# Altium PCB DT10966_MOTOR_CONTROLLER.PcbDoc (part 7 of 8)
Units mm, origin at the board's own origin, x right, y up, seen from the top; angles counter-clockwise.
Board outline 300 x 19 mm, 10 copper layers (Top Layer, Layer 2 GND, Layer 3 SIG, Layer 4 GND, Layer 5 PWR, Layer 6 PWR, Layer 7 GND, Layer 8 SIG, Layer 9 GND, Bottom Layer), stack 2.418 mm thick; 745 components, 446 nets, 2132 pads, 1222 vias.
Unrouted connection lines stored in the file: 3.
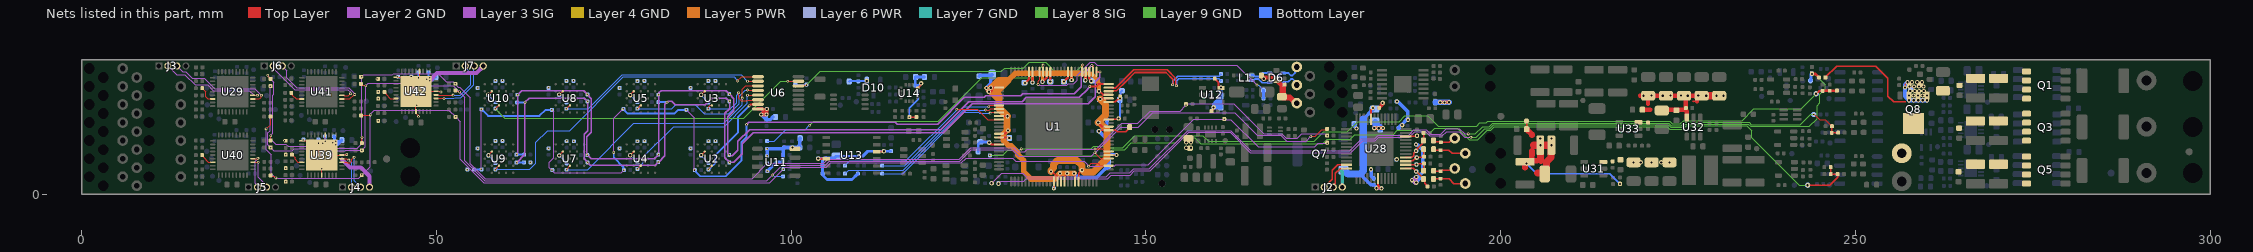
[diagram p14: the nets of this part, all layers, seen from the top]

## Via types
v1: diameter 0.6, hole 0.3, Top Layer to Bottom Layer, tented both sides, 726 vias
v2: diameter 0.4, hole 0.2, Top Layer to Bottom Layer, tented both sides, 493 vias
v3: diameter 0.5, hole 0.2, Top Layer to Bottom Layer, tented both sides, 3 vias

## Nets (pads, with @x,y where several pads share a name; then routed paths per layer and width w, separated by ;. In a path a pad name is that pad's centre, name@x,y a point inside that pad or via, vN(x,y) a via of type N, cw(c..) or ccw(c..) an arc to the next point about the centre after c; other vN are vias at no path point) (continued)
PSGND4: C202.1 C203.1 C204.1 C206.1 C207.1 C208.1 C209.1 C210.1 C211.1 J4.4 R229.1 U39.4 U39.10 U39.23 U39.32 U39.37 | length 26.1
  Top Layer w0.15: U39.10@31.037,7.537 U39.10@31.212,7.537 ; v2(31.232,7.667) 31.212,7.648 U39.10@31.212,7.537 ; U39.23@33.862,2.712 U39.37@33.862,5.537 ; U39.4@34.362,8.362 v2(34.362,7.483) 34.362,6.037 U39.37@33.862,5.537 ; v2(37.368,5.637) 37.3,5.637 37.217,5.555 36.704,5.555 U39.32@36.687,5.537 U39.37@33.862,5.537 ; U39.10@31.212,7.537 31.862,7.537 U39.37@33.862,5.537
  Layer 2 GND w0.6: 36.687,4.917 37.834,3.77 39.36,3.77 40.586,2.544 J4.4@40.586,1.015
  Bottom Layer w0.15: C202.1@34.338,8.208 C202.1@34.35,8.196 ; v2@34.35,7.496 v2(34.362,7.483)
  Bottom Layer w0.3: C207.1@33.369,7.746 33.38,7.736 33.38,7.185 v2(33.39,7.175) ; v2@34.35,7.496 C202.1@34.35,8.196
  Bottom Layer w0.4: v2(33.982,7.185) 34.025,7.142 34.025,6.55 C208.1@34.085,6.49 ; v2(35.395,7.263) 35.674,6.985 36.066,6.985 36.119,7.037 ; v2@35.467,7.264 v2@35.686,7.483 ; C210.1@35.573,8.198 35.593,8.198 35.653,8.138 35.653,7.638 v2(35.808,7.483) ; R229.1@36.676,7.65 R229.1@36.676,7.643 ; v2(35.808,7.483) 35.808,7.26 35.896,7.26 35.991,7.165 36.119,7.037 ; v2(35.808,7.483) 36.516,7.483 R229.1@36.676,7.643 ; 36.119,7.037 36.676,7.595 R229.1@36.676,7.643
  other v2: 28.773,1.781 33.855,3.592 28.773,3.69 28.773,5.592 35.81,6.985 28.602,7.572
PSGND5: C232.1 C233.1 C234.1 C236.1 C237.1 C238.1 C239.1 C240.1 C241.1 J7.4 R264.1 U42.4 U42.10 U42.23 U42.32 U42.37 | length 28.5
  Top Layer w0.15: U42.10@44.305,16.515 U42.10@44.508,16.515 ; v2(44.508,16.551) U42.10@44.508,16.515 ; U42.37@47.13,12.515 47.13,11.435 47.435,11.131 47.435,11.005 v2(47.482,10.957) ; v2(47.488,16.445) 47.488,14.872 U42.37@47.13,14.515 ; U42.4@47.63,17.34 47.63,16.64 47.499,16.509 47.424,16.509 47.13,16.215 U42.37@47.13,14.515 ; v2(50.63,14.43) 50.563,14.43 50.495,14.498 49.973,14.498 U42.32@49.955,14.515 U42.37@47.13,14.515 ; U42.10@44.508,16.515 45.13,16.515 U42.37@47.13,14.515
  Top Layer w0.4: U42.37@47.13,12.515 47.184,12.569 v2(47.23,12.569)
  Layer 2 GND w0.6: v2(49.089,16.005) 49.27,16.186 49.27,16.267 50.09,17.087 55.64,17.087 56.605,18.052 J7.4@56.605,18.1
  Bottom Layer w0.3: v2(47.488,16.445) C232.1@47.488,17.228 ; v2(48.663,16.213) 48.682,16.193 48.763,16.193 48.932,16.024 49.07,16.024 v2(49.089,16.005) ; v2@48.743,16.227 48.958,16.442 49.057,16.442 v2(49.076,16.461) ; C240.1@48.87,17.226 48.87,16.683 49.076,16.476 v2(49.076,16.461) ; 49.076,16.249 49.076,16.037 49.09,16.024 49.434,16.024 49.467,16.057 ; 49.076,16.249 v2(49.076,16.461) ; 49.076,16.249 49.114,16.287 49.465,16.287 ; v2(49.076,16.461) 49.104,16.461 49.158,16.515 49.465,16.515 ; 49.465,16.287 49.465,16.515 ; 49.465,16.287 49.465,16.058 49.467,16.057 ; 49.465,16.515 R264.1@49.925,16.515 49.925,16.476 49.718,16.269 49.679,16.269 49.467,16.057
  other v2: 41.803,10.367 41.803,13.488 41.803,14.433 47.332,15.173 41.636,16.27 46.466,16.605
REFCAP1: C149.2 U29.16 | length 2.5
  Top Layer w0.15: C149.2@17,14.958 17,14.938 17.496,14.442 17.496,13.735 17.782,13.449 U29.16@18.47,13.449
REFCAP2: C221.2 U40.16 | length 2
  Top Layer w0.15: C221.2@16.998,5.533 17.149,5.382 17.149,5.274 17.886,4.537 U40.16@18.496,4.537
REFCAP3: C231.2 U41.16 | length 1.9
  Top Layer w0.15: C231.2@29.562,14.299 29.713,14.148 29.713,13.992 30.256,13.449 U41.16@31.037,13.449
REFCAP4: C211.2 U39.16 | length 1.9
  Top Layer w0.15: C211.2@29.653,5.592 30.116,5.13 30.116,4.925 30.486,4.555 31.02,4.555 U39.16@31.037,4.537
REFCAP5: C241.2 U42.16 | length 2.1
  Top Layer w0.15: C241.2@42.683,14.433 42.834,14.282 42.834,14.151 43.487,13.498 44.288,13.498 U42.16@44.305,13.515
RSGND: C116.1 C121.1 C124.1 C126.1 C129.1 C130.1 C131.1 C132.1 C133.1 C134.2 C135.1 C136.1 C137.1 J2.4 R175.1 U28.10 | length 39.2
  Top Layer w0.2: U28.10@186.602,8.17 188.11,8.17 v1(188.198,8.257)
  Top Layer w0.5: v1(182.165,9.327) 182.173,9.319 182.783,9.319 182.789,9.324 183.384,9.324 v1(183.396,9.337) ; C136.1@182.851,12.198 182.851,12.218 183.327,12.694 183.327,12.878 v1(183.346,12.897) ; C136.1@182.874,12.193 C136.1@182.874,12.213
  Layer 2 GND w0.5: v1(182.165,9.327) 182.173,9.319 182.783,9.319 182.789,9.324 183.384,9.324 v1(183.396,9.337) ; v1(187.493,2.005) 187.512,2.024 187.648,2.024 188.056,2.433 v1(188.083,2.433) v1(188.083,1.65) 188.064,1.669 187.856,1.669 187.52,2.005 v1(187.493,2.005)
  Layer 9 GND w0.5: v1(182.165,9.327) 182.173,9.319 182.783,9.319 182.789,9.324 183.384,9.324 v1(183.396,9.337)
  Layer 5 PWR w0.5: v1(182.165,9.327) 182.173,9.319 182.783,9.319 182.789,9.324 183.384,9.324 v1(183.396,9.337)
  Layer 6 PWR w0.5: v1(182.165,9.327) 182.173,9.319 182.783,9.319 182.789,9.324 183.384,9.324 v1(183.396,9.337)
  Layer 4 GND w0.5: v1(182.165,9.327) 182.173,9.319 182.783,9.319 182.789,9.324 183.384,9.324 v1(183.396,9.337)
  Layer 7 GND w0.5: 177.456,3.367 177.66,3.163 J2.4@177.66,1.015
  Layer 3 SIG w0.5: v1(182.165,9.327) 182.173,9.319 182.783,9.319 182.789,9.324 183.384,9.324 v1(183.396,9.337)
  Layer 8 SIG w0.5: v1(182.165,9.327) 182.173,9.319 182.783,9.319 182.789,9.324 183.384,9.324 v1(183.396,9.337)
  Bottom Layer w0.5: C137.1@179.349,9.89 179.484,9.755 179.484,9.484 179.652,9.316 v1(179.652,9.289) v1@179.679,9.289 ; v1(181.722,3.527) 181.741,3.508 181.741,2.566 182.072,2.235 C135.1@182.092,2.235 ; v1(182.165,9.327) 182.184,9.346 182.184,10.317 C134.2@182.213,10.345 182.372,10.345 182.641,10.076 182.641,9.916 182.819,9.739 182.819,9.706 ; R175.1@182.764,9.327 182.329,9.327 182.708,9.706 182.819,9.706 ; v1(182.791,9.312) 182.81,9.292 182.81,9.226 182.952,9.084 R175.1@183.007,9.084 ; R175.1@182.819,9.273 182.819,9.706 ; v1(183.396,9.337) 183.369,9.337 183.227,9.194 183.117,9.194 R175.1@183.007,9.084 ; v1(185.354,13.082) 185.352,13.084 C121.1@185.304,13.084 185.304,13.064 185.314,13.054 185.516,13.054 186.911,11.659 v1(186.911,10.504) 186.713,10.504 186.113,9.904 186.113,9.777 v1(186.094,9.758) 186.075,9.739 185.916,9.739 185.581,9.405 C133.1@185.581,9.385 ; v1(187.493,2.005) v1@187.52,2.005 ; v1(188.044,7.036) 188.063,7.017 188.224,7.017 188.982,6.26 188.982,6.143 188.994,6.131 C129.1@188.996,3.239 C129.1@188.996,3.239 188.986,3.229 188.986,3.112 188.595,2.721 ; 182.819,9.706 182.968,9.706 183.298,9.376 R175.1@183.007,9.084 ; v1@187.52,2.005 187.928,2.414 188.064,2.414 v1(188.083,2.433) ; v1@187.52,2.005 187.856,1.669 188.064,1.669 v1(188.083,1.65) v1@188.083,1.677 ; v1@188.083,1.677 188.595,2.188 188.595,2.721 ; v1@188.083,1.677 v1(188.083,2.433) ; v1(188.083,2.433) 188.103,2.452 188.325,2.452 188.595,2.721
  other v1: 185.329,4.937
S1N: C130.2 R179.2 R181.1 U28.2 | length 3.7
  Top Layer w0.2: U28.2@186.602,4.17 186.628,4.196 188.082,4.196 v1(188.108,4.222) 188.174,4.288 189.092,4.288 R179.2@189.141,4.337 ; R181.1@189.125,3.326 189.141,3.342 R179.2@189.141,4.337 ; R179.2@189.158,4.354 R179.2@189.141,4.337
S1N_IN: C128.2 R181.2 X4.1 | length 3.2
  Top Layer w0.15: R181.2@190.535,3.326 R181.2@190.595,3.265
  Top Layer w0.2: R181.2@190.595,3.265 C128.2@191.509,3.265 191.65,3.407 193.254,3.407 X4.1@193.5,3.653
S1P: C129.2 R176.1 R177.2 U28.1 | length 4.5
  Top Layer w0.2: U28.1@186.602,3.67 187.625,3.67 v1(188.056,3.239) 188.077,3.239 189.117,2.199 R176.1@189.117,2.153 ; R176.1@189.117,2.165 189.246,2.036 189.246,1.6 R177.2@189.761,1.084
S1P_IN: C127.2 R176.2 X3.1 | length 4.8
  Top Layer w0.15: R176.2@190.527,2.165 R176.2@190.581,2.218
  Top Layer w0.2: R176.2@190.581,2.218 C127.2@191.509,2.218 192.705,2.218 193.395,1.528 X3.1@195,1.528
S2N: C132.2 R185.2 R186.1 U28.4 | length 5
  Top Layer w0.2: U28.4@186.602,5.17 186.652,5.22 187.48,5.22 187.715,5.455 187.715,5.796 188.128,6.209 188.128,6.317 188.193,6.382 188.193,6.44 188.545,6.792 188.545,6.798 188.912,7.165 188.912,7.38 189.142,7.61 189.142,8.636 R185.2@189.121,8.656
  other v1: 188.052,6.133
S2N_IN: C139.2 R186.2 X6.1 | length 3.2
  Top Layer w0.2: R186.2@190.543,7.435 191.445,7.435 C139.2@191.54,7.339 192.744,7.339 193.308,7.903 X6.1@193.5,7.903
S2P: C131.2 R183.1 R184.2 U28.3 | length 3.8
  Top Layer w0.2: U28.3@186.602,4.67 186.652,4.72 187.609,4.72 188.066,5.177 v1(188.163,5.177) ; v1@188.128,5.216 188.147,5.197 189.123,5.197 189.142,5.216 189.128,5.231 189.128,6.224 R183.1@189.114,6.238
S2P_IN: C138.2 R183.2 X5.1 | length 4.7
  Top Layer w0.2: R183.2@190.524,6.238 192.688,6.238 193.148,5.778 X5.1@195,5.778
SPI_A_EN: R99.1 U1.11 | length 25.7
  Top Layer w0.15: v2(123.327,11.993) 126.219,11.993 127.675,10.537 U1.11@129.286,10.537
  Bottom Layer w0.15: R99.1@107.584,4.037 108.258,4.712 116.146,4.712 123.227,11.792 123.227,11.824 123.327,11.925 v2(123.327,11.993)
SPI_A_MISO: R101.1 U1.8 | length 25.5
  Top Layer w0.15: v2(127.398,11.887) 127.946,11.887 128.096,12.037 U1.8@129.286,12.037
  Bottom Layer w0.15: R101.1@107.584,2.917 108.086,3.419 115.811,3.419 124.278,11.887 v2(127.398,11.887)
SPI_A_MOSI: R100.2 U1.7 | length 20
  Top Layer w0.15: v2(127.844,12.354) 127.901,12.354 128.085,12.537 U1.7@129.286,12.537
  Bottom Layer w0.15: R100.2@112.821,4.037 116.033,4.037 124.349,12.354 v2(127.844,12.354)
SPI_A_SCK: R102.2 U1.9 | length 20.1
  Top Layer w0.15: v2(128.04,11.459) 128.107,11.459 128.185,11.537 U1.9@129.286,11.537
  Bottom Layer w0.15: R102.2@112.819,2.908 115.691,2.908 124.326,11.543 126.412,11.543 126.496,11.459 v2(128.04,11.459)
SPI_B_CLK: R85.1 R94.1 R172.2 R191.2 R233.2 R248.2 R258.2 R268.2 U1.52 | length 185.2
  Top Layer w0.127: v2(26.004,9.219) 26.025,9.219 26.635,9.829 R191.2@26.635,10.949 ; R248.2@26.609,2.678 26.757,2.53 27.111,2.53 27.313,2.328 v2(27.387,2.328) ; R258.2@39.388,11.093 39.439,11.145 40.622,11.145 v2(40.674,11.197)
  Top Layer w0.15: v2(141.905,3.961) 142.311,4.367 143.358,4.367 143.446,4.279 143.446,4.141 143.55,4.037 U1.52@144.736,4.037
  Layer 3 SIG w0.127: v2(26.004,9.219) 26.017,9.206 26.017,6.289 26.705,5.601 26.705,2.95 26.901,2.755 27.327,2.328 v2(27.387,2.328) 27.432,2.283 30.958,2.283 30.968,2.293 39.079,2.293 39.514,2.729 40.649,3.864 ; 40.674,3.864 40.674,11.271 41.242,11.839 51.781,11.839 v2(52.708,10.912) 53.383,10.238 53.383,4.978 56.703,1.658 96.998,1.658 v2(98.884,3.545) 99.157,3.817 104.964,3.817 105.577,4.43 123.977,4.43 124.665,5.118
  Layer 3 SIG w0.15: 124.665,5.118 131.215,5.118 131.663,4.67 141.273,4.67 141.587,4.356 141.793,4.15 141.793,4.14 141.905,4.028 v2(141.905,3.961) ; v2@141.941,4.003 141.974,3.97 145.518,3.97 145.717,4.169 150.33,4.169 156.719,10.557 v2(161.012,10.557) ; v2@161.022,10.548 161.967,10.548 165.833,6.682 173.786,6.682 174.295,7.191 v2(175.528,7.191)
  other v2: 39.505,2.738
SPI_B_MISO: R87.1 R93.1 R173.2 R193.2 R235.2 R250.2 R260.2 R270.2 U1.56 | length 191.8
  Top Layer w0.127: v2(26.248,16.784) 26.248,16.71 26.336,16.622 26.336,16.607 26.635,16.307 R193.2@26.635,16.262 ; R250.2@26.635,7.616 26.648,7.63 26.648,8.242 v2(26.662,8.255) ; R235.2@39.508,7.21 39.517,7.218 39.517,8.014 v2(39.525,8.023)
  Top Layer w0.15: v2(142.817,6.396) 143.802,6.396 144.161,6.037 U1.56@144.736,6.037
  Layer 3 SIG w0.127: v2(26.248,16.784) 26.248,16.71 26.373,16.585 26.373,16.562 27.103,15.832 27.103,14.124 26.926,13.946 26.926,8.593 26.662,8.329 26.662,7.766 27.337,7.092 28.806,7.092 29.135,6.763 35.052,6.763 35.301,6.514 38.833,6.514 39.525,7.206 v2(39.525,8.023) 39.517,8.031 39.517,16.54 39.505,16.551 39.801,16.848 41.59,16.848 41.594,16.844 43.816,16.844 43.967,16.995 44.79,16.995 44.792,16.996 50.289,16.996 51.416,15.869 52.392,15.869 52.644,15.617 52.644,15.558 53.113,15.089 53.302,15.089 54.78,13.61 54.78,4.341 56.888,2.233 94.48,2.233 v2(96.607,4.36) 96.644,4.397 104.615,4.397 105.156,4.938 123.66,4.938 125.324,6.602 131.348,6.602 131.937,6.013 132.935,6.013 133.272,6.35 142.772,6.35 142.87,6.448 143.044,6.448 146.584,9.988 148.815,9.988 150.566,11.739 154.8,11.739 155.614,12.552 155.646,12.552 155.851,12.757 158.392,12.757 ; 158.392,12.758 162.383,12.758 166.574,8.567 169.118,8.567 169.755,7.93 171.328,7.93 171.952,8.555 175.2,8.555 v2(175.524,8.232)
  other v2: 155.64,12.552 52.673,15.588 39.508,16.555
SPI_B_MOSI: R86.1 R174.2 R194.2 R236.2 R251.2 R261.2 R271.2 U1.54 | length 190.5
  Top Layer w0.127: R271.2@52.681,14.698 52.851,14.528 53.1,14.528 53.187,14.44 v2(53.261,14.44) ; v2(173.242,8.165) 173.245,8.161 173.848,8.161 174.769,9.082 R174.2@175.528,9.082
  Top Layer w0.15: R261.2@39.371,15.571 39.537,15.404 39.868,15.404 39.974,15.298 v2(40.041,15.298) ; v2(142.801,5.869) 142.801,5.83 143.594,5.037 U1.54@144.736,5.037
  Layer 3 SIG w0.127: v2(26.575,15.251) 26.575,8.973 26.271,8.669 26.271,6.963 v2(26.657,6.577) 27.095,6.139 29.726,6.139 30.009,6.422 34.752,6.422 34.994,6.181 37.192,6.181 37.22,6.21 v2(39.508,6.21) 39.985,6.687 39.985,13.309 40.041,13.365 v2(40.041,15.298) 40.429,15.686 48.716,15.686 49.126,15.275 52.375,15.275 53.211,14.44 v2(53.261,14.44) 53.586,14.115 53.992,13.709 53.992,4.739 56.818,1.912 96.545,1.912 v2(97.359,2.727) 98.736,4.104 104.806,4.104 105.386,4.684 123.782,4.684 125.381,6.283 131.153,6.283 132.033,5.403 142.309,5.403 142.776,5.869 v2(142.801,5.869) 142.851,5.869 146.455,9.473 148.938,9.473 150.949,11.485 162.534,11.485 165.707,8.313 169.013,8.313 169.833,7.493 172.57,7.493 v2(173.242,8.165)
  Bottom Layer w0.15: v2(97.359,2.727) 97.426,2.727 97.627,2.526 98.86,2.526 R86.1@98.871,2.537
SPI_C_CLK: R18.1 R19.1 R32.1 R34.1 R35.1 R50.1 R51.1 R64.1 R65.1 U1.77 | length 135.6
  Top Layer w0.27: v2(142.373,18.161) 142.373,18.126 142.505,17.994 142.505,17.268 U1.77@142.511,17.262
  Layer 3 SIG w0.15: v2(56.321,3.529) 56.321,11.954 v2(56.354,11.986) ; v2(66.271,11.917) 66.532,11.657 66.532,5.141 65.937,4.545 65.937,3.775 66.642,3.069 76.073,3.069 v2(76.421,3.417) ; v2(75,5.921) 75,10.716 v2(76.321,12.037) ; v2(85.198,11.907) 85.24,11.907 86.371,10.775 v2(86.371,3.417)
  Layer 3 SIG w0.18: v2(93.701,9.837) 93.707,9.837 94.038,10.167 114.671,10.167 114.928,9.91 120.646,9.91 124.39,13.653 127.175,13.653 127.438,13.915 132.385,13.915 132.621,14.152 139.876,14.152 140.89,15.165 140.89,16.785 141.557,17.452 141.664,17.452 v2(142.373,18.161)
  Bottom Layer w0.27: R32.1@55.283,3.529 v2(56.321,3.529) R64.1@56.371,3.529 ; R65.1@56.233,11.865 v2(56.354,11.986) ; R65.1@56.325,12.015 v2(56.354,11.986) ; R65.1@56.354,11.983 v2(56.354,11.986) ; R65.1@56.361,11.986 56.361,11.975 56.493,11.843 56.505,11.843 57.293,11.055 64.517,11.055 65.38,11.917 v2(66.271,11.917) ; v2(75,5.921) 75,5.204 76.35,3.853 76.35,3.489 v2(76.421,3.417) ; R35.1@76.323,12.037 76.365,12.037 76.51,11.893 76.51,11.85 76.988,11.372 83.511,11.372 84.056,11.917 R19.1@85.229,11.917 85.218,11.907 v2(85.198,11.907) ; v2(86.371,3.417) 86.415,3.417 86.56,3.273 86.56,3.195 87.199,2.556 90.799,2.556 92.99,4.747 92.99,7.377 93.711,8.098 v2@93.711,9.827 ; R18.1@86.421,3.412 R18.1@86.421,3.417
  other v2: 66.294,3.417
SPI_C_EN: R49.2 TP2.1 U1.80 U6.6 | length 44.8
  Top Layer w0.15: U6.6@101.021,15.287 101.079,15.345 102.036,15.345 102.088,15.397 v2(102.155,15.397)
  Top Layer w0.153: U1.80@141.011,17.262 141.037,17.288 141.037,18.206 v2(141.063,18.232)
  Layer 8 SIG w0.15: v2(102.155,15.397) 104.076,17.318 129.584,17.318 130.061,17.794 132.701,17.794 133.533,18.626 135.838,18.626 137.027,17.437 140.267,17.437 v2(141.063,18.232)
  Bottom Layer w0.15: TP2.1@100.598,15.437 100.612,15.451 102.102,15.451 v2(102.155,15.397)
SPI_C_MISO: R22.1 R23.1 R33.1 R39.1 R40.1 R54.1 R55.1 R68.1 R69.1 U1.76 | length 129.3
  Top Layer w0.27: U1.76@143.011,17.262 143.029,17.244 143.497,17.244 v2(143.516,17.262)
  Layer 3 SIG w0.18: v2(61.321,4.474) 62.482,5.635 v2@62.482,12.938 ; v2@62.482,12.953 63.079,13.549 70.87,13.549 v2(71.321,13.097) 71.321,8.973 70.817,8.469 70.817,5.012 71.694,4.136 80.863,4.136 v2(81.287,4.559) 81.338,4.559 82.194,5.415 82.194,12.682 v2(82.5,12.987) 82.54,12.987 82.652,13.1 83.15,13.1 83.653,12.598 87.913,12.598 88.882,13.566 90.867,13.566 v2(91.321,13.112) 91.321,12.067 90.656,11.402 90.656,5.169 v2(91.327,4.498) 91.931,4.498 93.127,5.694 93.127,7.133 94.674,8.68 121.421,8.68 125.513,12.772 141.877,12.772 142.826,13.722 142.826,15.836 143.516,16.526 v2(143.516,17.262)
  Bottom Layer w0.27: R68.1@61.271,4.474 61.289,4.491 62.336,4.491 R33.1@62.354,4.508 ; R69.1@61.384,12.967 61.399,12.953 v2(62.488,12.953) ; R40.1@81.271,12.987 v2(82.5,12.987)
  other v2: 71.321,4.508
SPI_C_MOSI: R20.1 R21.1 R36.2 R37.1 R38.1 R52.1 R53.1 R66.1 R67.1 U1.75 | length 126.2
  Top Layer w0.27: v2(142.084,15.221) 143.003,15.221 143.319,15.537 U1.75@144.736,15.537
  Layer 3 SIG w0.18: v2(61.321,5.607) 61.321,5.667 61.457,5.802 v2(61.457,14.038) 62.019,14.6 65.781,14.6 65.784,14.603 70.756,14.603 v2(71.271,14.087) 71.852,13.506 71.852,8.768 71.217,8.133 71.217,5.695 71.243,5.669 71.243,5.566 71.806,5.003 77.535,5.003 77.537,5.004 80.728,5.004 v2(81.321,5.597) v2(81.321,14.037) 81.364,14.08 81.364,14.286 81.684,14.607 90.827,14.607 v2(91.321,14.112) 91.935,13.499 91.935,11.794 91.082,10.942 91.082,5.786 91.267,5.601 v2(91.267,5.564) 91.307,5.564 91.449,5.422 91.73,5.422 92.497,6.189 92.497,7.473 94.151,9.126 121.063,9.126 125.019,13.081 128.792,13.081 128.794,13.084 132.568,13.084 133.138,13.654 140.608,13.654 141.782,14.829 141.782,14.86 142.084,15.161 v2(142.084,15.221)
  Bottom Layer w0.27: v2(61.321,5.607) 61.331,5.597 62.337,5.597 62.341,5.6 R36.2@62.354,5.587 ; R67.1@61.407,14.038 R67.1@61.433,14.012 ; R67.1@61.446,14.025 R67.1@61.433,14.012 ; v2(61.457,14.038) 61.433,14.014 R67.1@61.433,14.012
  other v2: 71.271,5.538
SPI_EEPROM_CS: R84.1 U1.91 | length 44.3
  Top Layer w0.15: v2(135.508,18.219) 135.51,18.217 U1.91@135.511,17.262 U1.91@135.511,17.262
  Layer 8 SIG w0.15: v2(102.614,9.75) 103.175,10.311 120.709,10.311 126.865,16.467 133.757,16.467 v2(135.508,18.219)
  Bottom Layer w0.15: R84.1@96.606,7.512 97.582,7.512 99.2,9.13 101.948,9.13 102.568,9.75 v2(102.614,9.75)
SPI_FLASH1_CS: R10.1 U2.C2 U6.15 | length 13.4
  Top Layer w0.15: v2(88.341,3.518) 88.341,3.538 88.821,4.018 U2.C2@88.821,4.038
  Top Layer w0.27: v2(94.074,12.46) 94.074,12.484 94.277,12.687 U6.15@95.321,12.687
  Bottom Layer w0.27: v2(88.341,3.518) 88.38,3.518 88.58,3.718 88.622,3.718 89.324,4.419 89.324,5.509 92.5,8.686 92.5,10.886 v2(94.074,12.46)
SPI_FLASH2_CS: R14.1 U3.C2 U6.14 | length 10.4
  Top Layer w0.15: v2@88.333,12.06 v2(88.321,12.06) 88.364,12.103 88.364,12.318 88.576,12.531 88.815,12.531 U3.C2@88.821,12.537 ; v2(92.587,14.319) 92.587,13.512 92.938,13.161 93.741,13.161 93.879,13.298 95.282,13.298 U6.14@95.321,13.337
  Bottom Layer w0.15: v2(88.321,12.06) 91.421,12.06 92.306,12.945 92.306,13.999 92.587,14.28 v2(92.587,14.319)
SPI_FLASH3_CS: R24.1 U4.C2 U6.13 | length 23.2
  Top Layer w0.15: v2(78.321,3.587) 78.346,3.587 78.796,4.037 U4.C2@78.821,4.037 ; v2(93.84,13.97) 93.848,13.979 95.313,13.979 U6.13@95.321,13.987
  Bottom Layer w0.15: v2(78.321,3.587) 79.179,4.445 79.179,5.295 83.43,9.546 90.554,9.546 93.84,12.831 v2(93.84,13.97)
SPI_FLASH4_CS: R28.1 U5.C2 U6.12 | length 20.5
  Top Layer w0.15: v2(78.321,12.087) 78.346,12.087 78.796,12.537 U5.C2@78.821,12.537 ; v2(93.84,14.703) 93.872,14.67 95.289,14.67 U6.12@95.321,14.637
  Bottom Layer w0.15: v2(78.321,12.087) 83.162,12.087 83.7,12.625 86.482,12.625 87.77,11.337 91.222,11.337 92.674,12.789 92.674,13.817 93.511,14.655 93.792,14.655 v2(93.84,14.703)
SPI_FLASH5_CS: R41.1 U6.11 U7.C2 | length 33.9
  Top Layer w0.15: v2(68.371,3.471) 68.419,3.519 68.419,3.635 U7.C2@68.821,4.037 ; v2(93.105,13.563) 93.105,14.794 93.598,15.287 U6.11@95.321,15.287
  Bottom Layer w0.15: v2(68.371,3.471) 71.306,3.471 77.835,10 90.514,10 93.127,12.613 93.127,13.541 v2(93.105,13.563)
SPI_FLASH6_CS: R45.1 U6.10 U8.C2 | length 30
  Top Layer w0.15: v2(68.321,12.067) 68.336,12.067 68.806,12.537 U8.C2@68.821,12.537 ; v2(93.84,15.937) U6.10@95.321,15.937
  Bottom Layer w0.15: v2(68.321,12.067) 71.405,12.067 76.177,16.839 92.938,16.839 v2(93.84,15.937)
SPI_FLASH7_CS: R56.1 U6.9 U9.C2 | length 45.5
  Top Layer w0.15: v2(58.309,3.474) 58.309,3.499 58.821,4.012 U9.C2@58.821,4.037 ; v2(92.414,15.978) 93.024,16.587 U6.9@95.321,16.587
  Bottom Layer w0.15: R56.1@58.309,3.524 63.131,3.524 64,4.393 64,7.322 65.678,9 68.769,9 76.331,16.562 91.975,16.562 92.116,16.421 92.116,16.398 92.414,16.099 v2(92.414,15.978)
SPI_FLASH8_CS: R60.1 U6.7 U10.C2 | length 46.1
  Top Layer w0.15: v2(58.325,12.054) 58.332,12.054 58.815,12.537 U10.C2@58.821,12.537 ; v2(99.512,15.937) U6.7@101.021,15.937
  Layer 8 SIG w0.15: v2(58.325,12.054) 59.663,10.716 93.338,10.716 98.56,15.937 v2(99.512,15.937)
SWDCL_PGA: J2.3 U28.36 | length 3.9
  Top Layer w0.2: J2.3@176.39,1.015 176.39,1.234 176.688,1.533 176.688,2.96 177.35,3.622 178.214,3.622 U28.36@178.262,3.67
SWDCL_PGA1: J3.3 U29.30 | length 15.2
  Top Layer w0.15: U29.30@24.12,13.449 25.048,13.449 25.154,13.555 25.304,13.705 25.304,13.91 v2(25.352,13.958)
  Layer 3 SIG w0.15: J3.3@13.435,18.1 14.278,17.257 14.72,17.257 15.583,16.393 17.304,16.393 18.785,14.913 24.397,14.913 v2(25.352,13.958)
SWDCL_PGA2: J5.3 U40.30 | length 4.8
  Top Layer w0.15: U40.30@24.146,4.537 24.156,4.528 24.897,4.528 v2(24.907,4.518)
  Layer 3 SIG w0.15: v2(24.907,4.518) 24.879,4.491 24.879,2.392 26.073,1.199 J5.3@26.073,1.015
SWDCL_PGA3: J6.3 U41.30 | length 14.5
  Top Layer w0.15: U41.30@36.687,13.449 37.806,13.449 38.43,14.072 v2(38.489,14.072)
  Layer 3 SIG w0.15: J6.3@28.28,18.048 28.932,17.396 28.932,16.437 30.332,15.036 37.641,15.036 38.397,14.281 38.397,14.233 38.489,14.14 v2(38.489,14.072)
SWDCL_PGA4: J4.3 U39.30 | length 6.9
  Top Layer w0.15: U39.30@36.687,4.537 37.361,4.537 37.467,4.431 37.844,4.431 38.102,4.69 38.102,4.936 v2(38.409,5.242)
  Bottom Layer w0.15: v2(38.409,5.242) 38.406,5.239 38.406,1.945 39.316,1.035 J4.3@39.316,1.015
SWDCL_PGA5: J7.3 U42.30 | length 8.7
  Top Layer w0.15: U42.30@49.955,13.515 49.957,13.516 51.078,13.516 v2(51.08,13.518)
  Bottom Layer w0.15: v2(51.08,13.518) 52.482,13.518 52.568,13.604 53.429,13.604 55.286,15.46 55.286,17.999 J7.3@55.335,18.048
SWDIO_PGA: J2.2 U28.35 | length 5.2
  Top Layer w0.2: J2.2@175.12,1.015 176.237,2.132 176.237,3.42 176.987,4.17 U28.35@178.262,4.17
SWDIO_PGA1: J3.2 U29.31 | length 15
  Top Layer w0.15: U29.31@24.12,13.949 24.128,13.958 24.766,13.958 v2(24.775,13.966)
  Layer 3 SIG w0.15: J3.2@12.165,18.1 13.423,16.842 14.576,16.842 16.002,15.415 17.763,15.415 18.543,14.635 23.655,14.635 24.354,13.936 24.744,13.936 v2(24.775,13.966)
SWDIO_PGA2: J5.2 U40.31 | length 5.1
  Top Layer w0.15: U40.31@24.146,5.037 24.164,5.055 24.813,5.055 v2(24.852,5.094)
  Layer 3 SIG w0.15: J5.2@24.803,1.015 24.803,1.208 24.477,1.533 24.477,4.678 24.852,5.052 v2(24.852,5.094)
SWDIO_PGA3: J6.2 U41.31 | length 14.1
  Top Layer w0.15: U41.31@36.687,13.949 36.966,13.949 37.045,13.871 37.608,13.871 v2(37.907,14.169)
  Layer 3 SIG w0.15: J6.2@27.01,18.048 27.01,17.815 27.259,17.566 27.259,17.565 30.075,14.748 37.538,14.748 37.859,14.427 37.859,14.217 v2(37.907,14.169)
SWDIO_PGA4: J4.2 U39.31 | length 5.5
  Top Layer w0.15: U39.31@36.687,5.037 37.405,5.037 37.61,4.833 v2(37.677,4.833)
  Bottom Layer w0.15: v2(37.677,4.833) 38.046,4.465 38.046,1.028 J4.2@38.374,0.7
SWDIO_PGA5: J7.2 U42.31 | length 8.3
  Top Layer w0.15: U42.31@49.955,14.015 49.97,14 52.354,14 v2(52.368,13.985)
  Bottom Layer w0.15: v2(52.368,13.985) 53.374,13.985 54.852,15.463 54.852,17.128 54.253,17.727 J7.2@54.253,17.99
USB_CON_D_N: D6.3 D6.4 L1.1 X8.1 | length 7.8
  Bottom Layer w0.25: L1.1@164.85,16.04 165.1,16.04 165.312,16.251 165.769,16.251 165.777,16.244 165.852,16.244 166.359,15.736 167.368,15.736 D6.4@167.422,15.79 167.497,15.865 167.745,15.865 168.131,16.251 168.612,16.251 168.876,15.988 168.924,15.988 169.122,15.79 D6.3@169.322,15.79 169.397,15.865 170.051,15.865 170.447,16.261 170.654,16.261 171.253,15.662 X8.1@171.253,15.401
USB_CON_D_P: D6.1 D6.6 L1.4 X7.1 | length 8
  Bottom Layer w0.25: L1.4@164.85,16.84 165.1,16.84 165.312,16.628 165.952,16.628 166.414,17.09 D6.6@167.422,17.09 167.497,17.015 167.764,17.015 168.151,16.628 168.595,16.628 168.859,16.892 168.924,16.892 169.122,17.09 170.08,17.09 170.419,16.75 170.626,16.75 171.014,17.138 171.014,17.716 X7.1@171.253,17.955
USB_D_N: R203.2 U1.74 | length 19.3
  Top Layer w0.25: U1.74@144.736,15.037 145.325,15.037 145.386,14.975 145.693,14.975 146.892,16.175 148.267,17.55 152.979,17.55 154.203,16.327 154.203,15.641 154.204,15.639 154.204,15.421 154.279,15.346 v2(154.279,15.306)
  Bottom Layer w0.25: v2(154.279,15.306) 154.279,15.929 154.628,16.278 160.292,16.278 160.547,16.022 R203.2@160.549,16.022
USB_D_P: R202.2 U1.73 | length 19
  Top Layer w0.25: U1.73@144.736,14.537 145.325,14.537 145.386,14.599 145.849,14.599 147.269,16.019 148.424,17.173 152.823,17.173 153.826,16.171 153.826,15.632 153.781,15.587 153.781,15.481 v2(153.752,15.452)
  Bottom Layer w0.25: v2(153.752,15.452) 153.781,15.481 153.781,15.964 154.471,16.655 160.295,16.655 160.549,16.908 R202.2@160.55,16.908
USB_DET: R205.2 TP59.1 U1.92 | length 38.2
  Top Layer w0.127: v2(134.792,15.478) 134.792,15.915 134.919,16.042 134.919,16.077 135.011,16.169 U1.92@135.011,17.262
  Layer 3 SIG w0.127: v2(134.792,15.478) 134.866,15.478 134.985,15.359 138.839,15.359 139.069,15.59 139.81,15.59 140.332,16.111 140.332,16.808 142.146,18.622 142.692,18.622 143.096,18.217 162.816,18.217 v2(165.643,15.39)
  Bottom Layer w0.127: v2(165.643,15.39) 165.676,15.357 165.854,15.357 TP59.1@166.549,14.662
  Bottom Layer w0.4: R205.2@166.549,13.512 TP59.1@166.549,14.662
VA: C89.2 R130.1 R132.2 R216.1 TP8.1 | length 121.5
  Top Layer w0.3: v1(244.431,14.178) 244.489,14.178 244.874,14.563 245.32,14.563 245.364,14.606 246.352,14.606 247.347,14.606 R130.1@247.359,14.617
  Layer 8 SIG w0.127: v2@132.438,6.397 142.266,6.397 142.659,6.79 144.734,6.79 144.931,6.593 146.738,6.593 148.415,8.27 158.023,8.27 158.809,7.484 173.733,7.484 175.051,8.802 178.386,8.802 179.84,10.256 185.652,10.256 186.464,11.068 189.699,11.068 191.176,9.591 196.587,9.591 197.058,10.062 197.95,10.062 198.18,10.293 223.785,10.293 224.143,9.935 225.314,9.935 225.788,10.408 233.995,10.408 235.661,12.074 242.327,12.074 v1(244.431,14.178)
  Bottom Layer w0.127: R216.1@131.631,6.287 132.241,6.287 132.358,6.404 v2(132.431,6.404)
VB: C97.2 R140.1 R142.2 R241.1 TP13.1 | length 129.4
  Top Layer w0.127: v2(244.096,11.257) 244.169,11.257 244.28,11.147 244.284,11.147 244.909,10.521 245.748,10.521 R142.2@246.668,9.602 R142.2@246.645,9.579 ; C97.2@246.623,8.667 246.638,8.682 C97.2@246.645,8.689
  Top Layer w0.2: C97.2@246.638,8.682 247.525,8.682 R140.1@247.54,8.697 ; C97.2@246.645,8.689 R142.2@246.645,9.579
  Layer 3 SIG w0.127: v1(128.249,1.566) 129.667,2.985 132.616,2.985 133.132,2.469 140.076,2.469 140.078,2.47 144.409,2.47 144.953,3.015 147.696,3.015 148.262,3.58 150.477,3.58 155.87,8.974 161.971,8.974 164.782,6.162 178.731,6.162 180.424,7.855 182.23,7.855 182.712,8.338 187.002,8.338 187.74,9.076 189.523,9.076 190.119,8.48 191.562,8.48 191.607,8.524 ; 191.608,8.524 191.836,8.753 ; 191.836,8.754 192.327,9.245 194.163,9.245 194.893,8.515 v2(195.42,8.515)
  Layer 8 SIG w0.127: v2(195.42,8.515) 196.429,8.515 197.43,9.515 198.365,9.515 198.889,10.039 223.679,10.039 224.038,9.681 225.419,9.681 225.893,10.154 234.983,10.154 235.307,9.831 242.21,9.831 243.651,11.271 244.081,11.271 v2(244.096,11.257)
VBAT: C67.2 C68.2 C69.2 C74.2 C75.2 C76.2 C82.2 C83.2 C84.2 C157.2 C158.2 C161.2 C162.2 C167.2 C168.2 C177.2 C178.2 C179.2 C180.2 C246.2 C247.2 C248.2 C249.2 D7.1 Q1.5 Q1.6 Q1.7 Q1.8 Q3.5 Q3.6 Q3.7 Q3.8 Q5.5 Q5.6 Q5.7 Q5.8 Q8.1 Q8.2 Q8.3 R6.1 R7.1 R8.1 R131.2 TP40.1 U31.3 U32.3 U33.3 | length 44
  Top Layer w0.2: 227.074,13.079 227.095,13.1 227.651,13.1 ; R131.2@245.733,16.473 245.733,16.478 247.31,18.056 252.867,18.056 254.554,16.369 254.554,13.829 255.339,13.043 257.042,13.043 257.076,13.077 ; v1(256.962,15.054) 256.968,15.06 256.968,15.542 256.993,15.567
  Top Layer w0.6: 219.606,13.917 219.625,13.899 C179.2@220.757,13.899 ; C180.2@219.956,11.943 221.049,11.943 221.068,11.962 ; 220.754,12.723 220.754,13.895 C179.2@220.757,13.899 ; C177.2@222.693,11.815 222.797,11.919 224.595,11.919 224.605,11.91 C168.2@224.655,11.91 ; C168.2@224.74,11.825 C168.2@224.655,11.91 ; R7.1@226.076,12.164 226.076,13.628 C167.2@225.805,13.899 ; U32.3@226.215,10.837 226.215,11.722 226.072,11.865 R7.1@226.072,12.161 225.822,11.91 C168.2@224.655,11.91 ; 227.651,13.1 227.651,13.729 C249.2@227.82,13.899 ; v1(227.82,13.925) C249.2@227.82,13.899 ; C249.2@228.306,13.899 C249.2@227.82,13.899 ; C179.2@220.757,13.899 C178.2@223.272,13.899 C167.2@225.805,13.899 ; C167.2@225.805,13.899 v1(226.347,13.899) C249.2@227.82,13.899
  Top Layer w1: C249.2@228.306,13.899 v1(230.382,13.899) C248.2@230.771,13.899
  Bottom Layer w0.6: v1(257.291,15.791) 256.962,15.462 v1(256.962,15.054) 256.962,13.837 v1(257.536,13.263) v1(258.181,13.263) v1(258.826,13.263) v1(259.449,13.263) v1(260.071,13.263) v1(260.072,13.923)
  other v1: 218.715,4.511 219.72,4.511 221.25,4.511 222.609,4.511 223.759,4.511 220.094,13.895 222.825,13.895 228.955,13.899 231.394,13.899 221.214,13.91 223.932,13.925 225.402,13.925 257.533,13.923 258.154,13.923 258.803,13.923 259.444,13.923 257.704,14.567 258.327,14.567 258.954,14.567 259.59,14.567 257.568,15.199 258.238,15.199 258.908,15.199 259.578,15.199 257.955,15.791 258.689,15.791 259.344,15.791
VBUS: C152.2 C153.2 C154.2 D6.5 FB14.1 X9.1 | length 10.6
  Top Layer w0.6: FB14.1@166.29,16.749 166.35,16.689 166.35,16.634 166.588,16.396 v1(166.588,16.288) ; FB14.1@166.61,16.468 167.909,16.468 168.237,16.14 168.287,16.14 C153.2@168.372,16.055 ; C153.2@168.422,16.055 169.092,15.385 ; C152.2@169.523,15.445 C152.2@169.463,15.385 ; 169.092,15.385 169.092,13.829 C154.2@169.157,13.764 169.312,13.764 169.435,13.887 169.435,15.357 C152.2@169.463,15.385 ; 169.092,15.385 C152.2@169.463,15.385
  Top Layer w0.8: C154.2@169.333,13.743 169.425,13.651 170.274,13.651 171.064,12.861 X9.1@171.253,12.861
  Bottom Layer w0.2: v1(166.588,16.288) 166.664,16.364 167.346,16.364 D6.5@167.422,16.44
VC: C106.2 R150.1 R153.2 R275.1 TP18.1 | length 131.5
  Top Layer w0.2: v1(243.24,1.289) 246.341,1.289 247.447,2.396 247.447,2.838 R150.1@247.468,2.859 R153.2@246.497,2.859 246.486,2.869 246.486,3.831 C106.2@246.475,3.841
  Layer 8 SIG w0.127: v2(127.996,5.52) 129.825,5.52 130.533,6.228 131.762,6.228 132.555,5.435 139.796,5.435 139.804,5.443 144.395,5.443 145.259,6.307 146.99,6.307 147.948,7.265 154.161,7.265 154.9,8.003 156.837,8.003 157.717,7.123 174.908,7.123 175.562,7.777 178.787,7.777 179.44,8.43 184.858,8.43 185.43,9.001 188.56,9.001 188.994,8.568 189.93,8.568 190.69,9.328 190.696,9.328 191.02,9.328 193.869,9.328 195.531,7.666 196.722,7.666 198.063,9.007 198.576,9.007 199.1,9.531 223.469,9.531 223.827,9.173 225.63,9.173 226.103,9.646 234.668,9.646 235.34,8.975 235.34,7.972 242.023,1.289 v1(243.24,1.289)
VDC: C90.2 R131.1 R133.2 R277.1 TP9.1 | length 133.3
  Top Layer w0.4: v1(243.836,16.983) 243.861,16.958 244.353,16.958 244.833,16.478 R131.1@244.833,16.473
  Layer 3 SIG w0.127: v1(129.213,1.488) 129.578,1.853 132.743,1.853 133.099,2.208 144.589,2.208 145.11,2.729 147.77,2.729 148.334,3.293 150.576,3.293 156.002,8.72 161.866,8.72 164.706,5.879 178.82,5.879 180.525,7.584 182.318,7.584 182.808,8.075 187.11,8.075 187.854,8.818 189.422,8.818 190.014,8.226 191.777,8.226 192.395,8.843 194.158,8.843 194.945,8.056 v2(195.781,8.056)
  Layer 8 SIG w0.127: v2(195.781,8.056) 196.56,8.056 197.765,9.261 198.471,9.261 198.995,9.785 223.574,9.785 223.933,9.427 225.525,9.427 225.998,9.9 234.878,9.9 235.202,9.577 243.449,9.577 244.556,10.684 244.556,12.508 244.938,12.891 244.938,14.096 245.732,14.89 245.732,15.452 244.239,16.946 243.873,16.946 v1(243.836,16.983)
  Bottom Layer w0.4: TP9.1@243.641,16.009 243.708,16.076 243.708,16.935 243.756,16.983 v1(243.836,16.983)
VDD: C134.1 C135.2 C136.2 Q7.3 TP90.1 U28.20 U28.43 | length 20.9
  Top Layer w0.3: U28.20@181.682,10.59 181.682,11.881 181.864,12.063 181.884,12.063 181.99,12.169 v1(181.99,12.189) C136.2@181.994,12.193 ; U28.43@182.682,2.25 182.682,1.136 ; 182.682,1.136 182.818,1.136 v1@183.097,0.857 ; 182.682,1.136 182.491,0.946 v1(182.491,0.864) 182.498,0.857 v1@183.097,0.857 ; v1@183.097,0.857 183.104,0.85 v1(183.186,0.85) 183.179,0.857 v1@183.097,0.857
  Bottom Layer w0.5: 180.187,2.844 181.665,1.365 182.082,1.365 C135.2@182.092,1.355 182.112,1.355 182.472,0.995 182.472,0.883 v1(182.491,0.864) 182.498,0.857 183.179,0.857 v1(183.186,0.85) ; 180.618,10.595 181.99,11.967 v1(181.99,12.189)
  Bottom Layer w1: Q7.3@178.012,3.322 178.489,2.844 180.187,2.844 180.618,3.274 TP90.1@180.618,3.313 180.618,10.595
VDD_1V2: C17.2 C18.2 C19.2 C20.2 C21.2 C22.2 C23.2 C24.2 C25.2 C196.2 FB15.2 U1.16 U1.39 U1.45 U1.63 U1.71 U1.78 U1.84 U1.89 U1.95 | length 34.9
  Top Layer w0.2: v1@130.52,8.037 130.626,7.931 v1(130.735,7.931) ; v1(136.625,3.216) 136.701,3.14 136.892,3.14 137.492,2.54 137.492,1.832 U1.39@137.511,1.812 ; U1.45@140.511,1.812 140.511,2.963 v1(140.963,3.415) ; v1(143.266,10.115) 143.824,9.557 144.717,9.557 U1.63@144.736,9.537
  Top Layer w0.3: U1.16@129.286,8.037 v1@130.52,8.037 ; v1(132.97,15.7) 133.511,16.241 U1.95@133.511,17.262 ; v1(136.511,15.882) U1.89@136.511,17.262 ; v1(138.423,15.881) 139.011,16.469 U1.84@139.011,17.262 ; U1.78@142.011,17.262 142.011,16.308 142.285,16.035 v1(142.285,15.953) ; v1(143.547,13.433) 143.628,13.433 143.732,13.537 U1.71@144.736,13.537
  Layer 5 PWR w1: v1(136.625,3.216) 136.625,3.36 136.959,3.695 136.959,4.231 137.502,4.774 140.25,4.774 140.963,4.06 v1(140.963,3.415) 141.245,3.134 142.579,3.134 144.532,5.086 144.532,9.054 143.47,10.115 v1(143.266,10.115) 144.304,11.153 144.304,12.676 v1(143.547,13.433)
  other v1: 155.669,6.567 156.349,6.567 155.669,7.334 156.349,7.334
VDD_ACC: C58.2 C59.2 C60.2 C61.2 R95.2 R96.2 R97.2 R98.2 U13.4 U13.10 | length 20.8
  Top Layer w0.3: v1(103.81,5.034) 103.825,5.019 104.944,5.019 U13.4@104.959,5.003 ; U13.10@112.071,6.003 112.104,6.036 113.028,6.036 v1(113.061,6.069)
  Bottom Layer w0.3: v1(113.061,6.069) 113.076,6.084 114.077,6.084 R95.2@114.092,6.099
  Bottom Layer w0.4: v1(103.81,5.034) 103.872,5.096 104.441,5.096 ; R98.2@109.389,2.917 109.389,2.912 109.314,2.837 109.309,2.837 108.575,2.104 105.062,2.104 104.496,2.67 104.496,2.842 R97.2@104.421,2.917 R96.2@104.421,4.037 104.421,5.076 104.441,5.096 ; v1(113.061,6.069) 110.794,6.069 110.093,5.368 C58.2@106.347,5.368 106.136,5.157 104.881,5.157 C61.2@104.821,5.097 104.82,5.096 104.441,5.096
VDD_ACCEL: C62.2 C63.2 FB9.1 R105.2 R106.2 U14.11 | length 10.4
  Top Layer w0.2: v2(116.653,10.885) R105.2@117.653,10.885 ; U14.11@117.821,15.035 117.885,15.035 118.238,15.387 118.238,15.571 v1(118.314,15.647)
  Bottom Layer w0.2: v2(116.653,10.885) 116.653,12.149 117.932,13.428 117.932,14.531 117.593,14.869 117.593,15.22 C62.2@117.499,15.314
  Bottom Layer w0.4: C62.2@117.49,15.323 117.49,16.506 C63.2@117.521,16.537 FB9.1@118.774,16.537 ; C62.2@117.559,15.304 117.559,15.338 117.959,15.338 118.269,15.647 v1(118.314,15.647)
VDD_CLDR: C150.2 D10.1 FB13.2 | length 2.5
  Bottom Layer w0.3: FB13.2@108.18,15.911 108.242,15.973 110.593,15.973 D10.1@110.655,16.035
  other v1: 110.643,15.996
VDD_EEPROM: C52.2 C53.2 C54.2 FB6.2 R79.2 R80.2 R81.2 R82.2 R83.2 U11.8 | length 11.7
  Bottom Layer w0.5: v2(96.609,5.444) v2(96.609,5.444) 96.607,6.422 v2(96.606,6.423) 98.823,6.423 C52.2@98.884,6.484 ; v2(96.645,3.265) 96.645,3.27 97.89,4.515 98.859,4.515 98.884,4.54 R82.2@98.884,4.545 C52.2@98.884,6.484 ; FB6.2@101.204,6.604 C52.2@99.005,6.605 98.985,6.605 98.975,6.595 98.975,6.575 C52.2@98.884,6.484 ; FB6.2@101.204,6.604 101.226,6.626 101.226,7.875 C54.2@101.248,7.897
  other v1: 100.176,6.602
VDD_FLASH: C42.2 C43.2 C44.2 C45.2 C46.2 C47.2 C48.2 C49.2 C50.2 C51.2 FB5.2 R10.2 R11.2 R12.2 R13.2 R14.2 R15.2 R16.2 R17.2 R24.2 R25.2 R26.2 R27.2 R28.2 R29.2 R30.2 R31.2 R32.2 R33.2 R41.2 R42.2 R43.2 R44.2 R45.2 R46.2 R47.2 R48.2 R56.2 R57.2 R58.2 R59.2 R60.2 R61.2 R62.2 R63.2 U2.B4 U3.B4 U4.B4 U5.B4 U6.16 U7.B4 U8.B4 U9.B4 U10.B4 | length 28.1
  Top Layer w0.15: v1(57.321,14.037) U10.B4@57.821,14.537 ; v1(57.34,5.513) 57.34,5.534 57.821,6.016 U9.B4@57.821,6.037 ; v1(67.321,5.477) 67.321,5.507 67.821,6.007 U7.B4@67.821,6.037 ; v1(67.321,14.076) 67.341,14.076 67.802,14.537 U8.B4@67.821,14.537 ; v1(77.321,5.52) 77.321,5.528 77.821,6.029 U4.B4@77.821,6.037 ; v1(77.321,13.977) 77.321,14.007 77.821,14.507 U5.B4@77.821,14.537 ; v1(87.321,5.537) U2.B4@87.821,6.038 ; v1(87.321,14.037) U3.B4@87.821,14.537 ; U6.16@95.301,12.017 U6.16@95.321,12.037 ; v1@96.53,12.058 v1(96.551,12.037)
  Top Layer w0.25: U6.16@95.301,12.017 95.892,12.017 96.534,12.017 96.538,12.017 v1@96.551,12.017
  Top Layer w0.5: U6.16@95.321,12.037 95.871,12.037 95.892,12.017 96.191,11.718 96.191,11.67 ; 96.191,11.67 v1@96.534,12.012 ; 96.191,11.67 95.777,11.256 v1(95.777,11.248) v1(96.516,11.248) 96.534,11.265 v1@96.534,12.012 ; v1@96.534,12.012 96.538,12.017 96.551,12.03 v1(96.551,12.037) 96.534,12.02 96.534,12.017 v1@96.534,12.012
  Bottom Layer w0.15: v1(57.321,14.037) 57.321,13.995 58.329,12.987 R60.2@58.332,12.987 ; v1(57.34,5.513) 57.34,5.479 58.142,4.677 58.142,4.59 R56.2@58.309,4.424 ; v1(67.321,5.477) 67.341,5.477 68.205,4.614 68.205,4.537 R41.2@68.371,4.371 ; v1(67.321,14.076) 67.321,13.98 68.321,12.98 R45.2@68.321,12.967 ; v1(77.321,5.52) 77.321,5.498 78.321,4.497 R24.2@78.321,4.487 ; v1(77.321,13.977) 77.334,13.977 78.321,12.99 R28.2@78.321,12.987 ; C43.2@87.321,5.477 87.341,5.477 88.175,4.644 88.175,4.584 R10.2@88.341,4.418 ; C44.2@87.321,13.977 88.321,12.976 R14.2@88.321,12.96 ; C44.2@87.321,13.977 v1(87.321,14.037)
  Bottom Layer w0.5: v1(96.551,12.037) 96.551,12.017 C45.2@96.516,11.983 ; 97.423,10.901 97.038,10.516 96.519,10.516 C42.2@96.516,10.513 ; v1@95.782,11.248 C45.2@96.516,11.983 ; v1@95.782,11.248 v1(96.516,11.248) ; v1@95.782,11.248 v1(95.777,11.248) 95.777,11.232 96.496,10.513 C42.2@96.516,10.513 ; C42.2@96.516,10.513 v1(96.516,11.248) ; v1(96.516,11.248) C45.2@96.516,11.983
  other v2: 54.332,3.477 63.254,4.508 55.821,6.487 65.821,6.487 75.821,6.487 85.821,6.487 69.371,7.487 78.321,7.487 58.325,7.537 68.371,7.537 79.321,7.537 88.341,7.537 89.341,7.537 59.321,7.587 55.821,14.987 75.821,14.987 65.821,15.037 85.821,15.037 78.317,15.969 68.321,15.987 89.321,15.987 79.275,16.01 58.314,16.038 69.321,16.037 88.321,16.037 59.322,16.069
VDD_TEMP_SENS: C55.2 C56.2 C57.2 FB7.2 R90.2 R91.2 U12.6 | length 10.1
  Top Layer w0.3: R91.2@159.229,11.728 159.229,11.733 159.477,11.98 159.477,12.208 v1(159.534,12.266) ; R90.2@159.686,16.309 159.686,16.304 160.238,15.753 160.238,15.153 160.392,14.998 U12.6@160.562,14.998 160.552,15.008 v1(160.552,15.068)
  Bottom Layer w0.5: C56.2@160.494,14.998 160.494,15.009 C56.2@160.521,15.037 ; C57.2@160.549,13.835 160.521,13.863 C56.2@160.521,15.037 ; v1(160.552,15.068) C56.2@160.521,15.037 ; C57.2@160.562,13.728 160.562,13.701 160.33,13.47 160.303,13.47 159.845,13.012 ; C57.2@160.562,13.701 160.562,12.991 ; 159.534,12.701 160.53,12.701 160.562,12.733 ; 159.534,12.701 159.845,13.012 ; 159.534,12.701 v1(159.534,12.266) C55.2@159.501,12.233 FB7.2@160.575,12.233 160.562,12.246 160.562,12.733 ; 159.845,13.012 159.865,12.991 160.562,12.991 ; 160.562,12.733 160.562,12.991
VDDA_MCU: C13.2 C14.2 C15.2 FB2.2 U1.18 U1.38 | length 5.3
  Top Layer w0.3: v1(127.905,7.291) 127.965,7.291 128.219,7.037 U1.18@129.286,7.037 ; v3(137.011,0.807) U1.38@137.011,1.812
  Bottom Layer w0.4: FB2.2@126.352,6.057 126.352,7.103 126.378,7.129 126.378,7.156 126.61,7.387 C13.2@126.637,7.387 126.655,7.369 127.827,7.369 v1(127.905,7.291)
VDDIO_MCU: C16.2 C27.2 C28.2 C29.2 C30.2 C31.2 C32.2 C33.2 C34.2 C35.2 C36.2 C37.2 C38.2 C39.2 C40.2 FB3.2 R4.2 R5.1 U1.2 U1.10 U1.15 U1.40 U1.41 U1.44 U1.55 U1.62 U1.72 U1.79 U1.83 U1.90 U1.94 | length 97.9
  Top Layer w0.2: U1.15@129.286,8.537 129.301,8.553 130.082,8.553 v1(130.545,9.016) ; U1.10@129.286,11.037 129.297,11.026 130.479,11.026 v1(130.49,11.014) ; v1(137.886,2.967) 137.963,2.89 137.963,2.66 137.973,2.65 137.973,2.496 137.992,2.477 137.992,1.831 U1.40@138.011,1.812 ; U1.41@138.511,1.812 138.53,1.831 138.53,2.503 138.886,2.858 v1(138.886,2.967) ; v1(139.873,2.959) 139.95,2.883 139.95,2.672 139.98,2.642 139.98,2.489 139.992,2.477 139.992,1.831 U1.44@140.011,1.812 ; v1(143.378,8.896) 143.487,8.896 143.628,9.037 145.735,9.037 145.941,8.831 147.113,8.831 147.7,9.418 R4.2@147.7,9.473 ; U1.55@144.736,5.537 v1(145.83,5.537)
  Top Layer w0.3: v1@128.112,14.988 128.131,15.007 v1(128.131,15.027) 128.141,15.037 U1.2@129.286,15.037 ; v1(134.011,15.766) U1.94@134.011,17.262 ; v1(135.413,15.87) 136.011,16.469 U1.90@136.011,17.262 ; U1.83@139.511,17.262 139.511,16.13 v1(139.519,16.122) ; v1(141.462,16.088) 141.511,16.137 U1.79@141.511,17.262 ; v1(143.393,14.537) 143.453,14.537 143.953,14.037 U1.72@144.736,14.037
  Top Layer w0.5: v1(127.527,15.004) 127.527,14.977 127.835,14.669 127.835,14.478 v1(127.854,14.459)
  Top Layer w0.6: v1(127.527,15.004) 128.107,15.004 v1(128.131,15.027) ; v1(127.854,14.459) 128.112,14.717 v1@128.112,14.988
  Layer 5 PWR w0.3: 135.413,17.052 135.438,17.077 ; 141.462,16.985 141.511,17.033
  Layer 5 PWR w0.4: v1(134.011,15.766) 134.001,15.776 134.001,16.422 134.011,16.432 134.011,17.077 ; v1(135.413,15.87) 135.413,17.052 ; v1(139.519,16.122) 139.519,17.069 ; v1(141.462,16.088) 141.462,16.985
  Layer 5 PWR w0.5: v1@128.119,15.016 127.539,15.016 v1(127.527,15.004) 127.546,14.985 127.546,14.794 127.854,14.486 v1(127.854,14.459) ; v1(128.131,15.027) 128.131,15 127.873,14.743 127.873,14.478 v1(127.854,14.459) ; 129.258,12.804 129.258,13.056 v1(127.854,14.459)
  Layer 5 PWR w0.6: 139.511,17.077 139.519,17.069 ; 141.456,17.067 141.5,17.023 ; 141.511,17.033 142.283,17.033 143.186,16.13 143.186,15.839 143.393,15.633 v1(143.393,14.537)
  Layer 5 PWR w0.8: 130.543,16.023 131.598,17.077 134.011,17.077 135.438,17.077 139.511,17.077 ; v1(130.545,9.016) 130.376,9.016 129.908,8.547 129.908,7.589 130.633,6.863 130.991,6.863 131.704,6.15 131.704,6.102 131.922,5.885 131.922,5.592 132.751,4.763 132.751,3.222 133.803,2.17 137.089,2.17 v1(137.886,2.967) 137.894,2.959 v1(139.873,2.959) ; 139.519,17.067 141.456,17.067
  Layer 5 PWR w1: v1(128.131,15.027) 129.076,14.082 ; v1@128.228,15.027 129.224,16.023 130.543,16.023 129.076,14.556 129.076,14.082 ; 129.258,12.804 129.258,12.196 v1@130.439,11.014 ; 129.258,13.056 129.258,13.9 129.076,14.082 ; 130.415,9.296 130.415,10.939 v1(130.49,11.014)
  Layer 3 SIG w0.5: v1(128.131,15.027) v1@128.119,15.016 ; v1@128.119,15.016 128.112,15.008 128.112,14.744 127.854,14.486 v1(127.854,14.459) 127.835,14.478 127.835,14.669 127.527,14.977 v1(127.527,15.004) 127.539,15.016 v1@128.119,15.016
  Bottom Layer w0.2: C38.2@144.655,5.709 145.549,5.709 145.721,5.537 v1(145.83,5.537)
  Bottom Layer w0.4: v1(137.886,2.967) C30.2@137.89,2.963 ; C16.2@139.869,2.963 v1(139.873,2.959) ; 143.678,9.037 144.504,9.863 R5.1@144.504,10.437
  Bottom Layer w0.5: FB3.2@126.496,16.65 126.606,16.76 C27.2@128.192,16.76 ; C27.2@128.316,16.884 C27.2@128.192,16.76 ; C16.2@139.884,2.959 139.893,2.959 139.903,2.949 139.903,2.939 140.422,2.42 143.072,2.42 C28.2@144.457,3.805 ; v1(143.378,8.896) 144.655,7.619 C38.2@144.655,5.709 144.645,5.699 144.645,4.359 C28.2@144.577,4.291 ; v1(127.527,15.004) 127.527,14.977 127.835,14.669 127.835,14.478 v1(127.854,14.459) 127.873,14.478 127.873,14.75 128.131,15.007 v1@128.131,15.026 ; v1(127.527,15.004) 127.527,15.031 128.131,15.635 ; v1(127.527,15.004) 127.539,15.016 128.121,15.016 v1@128.131,15.026 ; v1@128.131,15.026 v1(128.131,15.027) 128.131,15.635 ; 128.131,15.635 128.131,16.699 C27.2@128.192,16.76
  Bottom Layer w0.6: C30.2@137.89,2.963 C16.2@139.869,2.963
  Bottom Layer w0.8: C28.2@144.457,3.805 144.457,4.171 C28.2@144.577,4.291
VDDOSC: C9.2 C10.2 C11.2 FB1.2 U1.65 U1.70 | length 7.8
  Top Layer w0.2: U1.65@144.736,10.537 144.755,10.557 146.025,10.557 C10.2@146.147,10.679 ; U1.70@144.736,13.037 145.699,13.037 146.199,13.537 146.199,13.569 146.229,13.599 C11.2@146.261,13.599 ; v1(146.331,13.533) 146.331,13.593 146.285,13.638 146.268,13.638 146.247,13.659 146.239,13.659 C11.2@146.35,13.77
  Bottom Layer w0.3: v1(146.147,10.675) 146.147,10.756 146.331,10.94 C9.2@146.331,13.406 ; C9.2@146.321,13.322 146.321,13.395 C9.2@146.331,13.406 ; v1(146.331,13.533) C9.2@146.331,13.406 ; C9.2@146.39,13.464 146.39,14.399 146.597,14.606 FB1.2@146.601,14.606
VIN: Q8.5 X31.1
VPWR: C163.2 C164.2 C165.2 C166.2 L2.2 R212.2 R290.2 TP41.1 | length 35
  Top Layer w0.2: TP41.1@203.621,10.342 203.627,10.336 203.627,9.202 C163.2@203.633,9.196
  Top Layer w0.5: v1(191.47,12.963) 191.475,12.968 192.696,12.968 v1(192.701,12.973)
  Top Layer w0.8: 203.397,3.757 203.397,4.579 C166.2@203.418,4.6 ; C163.2@203.633,9.196 203.633,9.176 204.383,8.426 204.383,8.317 ; 204.398,6.107 204.398,5.58 204.368,5.55 C166.2@204.368,4.75 ; 205.077,4.75 C166.2@204.368,4.75 ; C166.2@203.418,4.6 204.218,4.6 C166.2@204.368,4.75 ; C166.2@203.418,4.6 203.568,4.75 C166.2@204.368,4.75
  Top Layer w1: 204.603,6.927 204.603,6.926 C164.2@205.567,6.926 ; 205.172,3.005 206.062,3.005 L2.2@206.189,2.878 206.439,3.128 206.439,4.578 207.076,5.215 207.076,6.876 v1(207.126,6.926) C164.2@205.567,6.926 ; v1(205.566,6.927) C164.2@205.567,6.926 ; 205.689,4.778 205.616,4.851 205.616,6.877 C164.2@205.567,6.926
  Bottom Layer w0.2: v1(203.645,4.328) 205.049,2.923 215.349,2.923 v1(216.792,1.481)
  Bottom Layer w0.8: R290.2@190.768,12.967 190.772,12.963 v1(191.47,12.963) 192.691,12.963 v1(192.701,12.973)
  other v1: 205.549,7.893 207.126,7.893 192.08,12.958